# Altium PCB PCB_Propu.PcbDoc
Units mm, origin at the board's own origin, x right, y up, seen from the top; angles counter-clockwise.
Board outline 75 x 44.6 mm, 2 copper layers (Top Layer, Bottom Layer); 37 components, 24 nets, 135 pads, 4 vias.
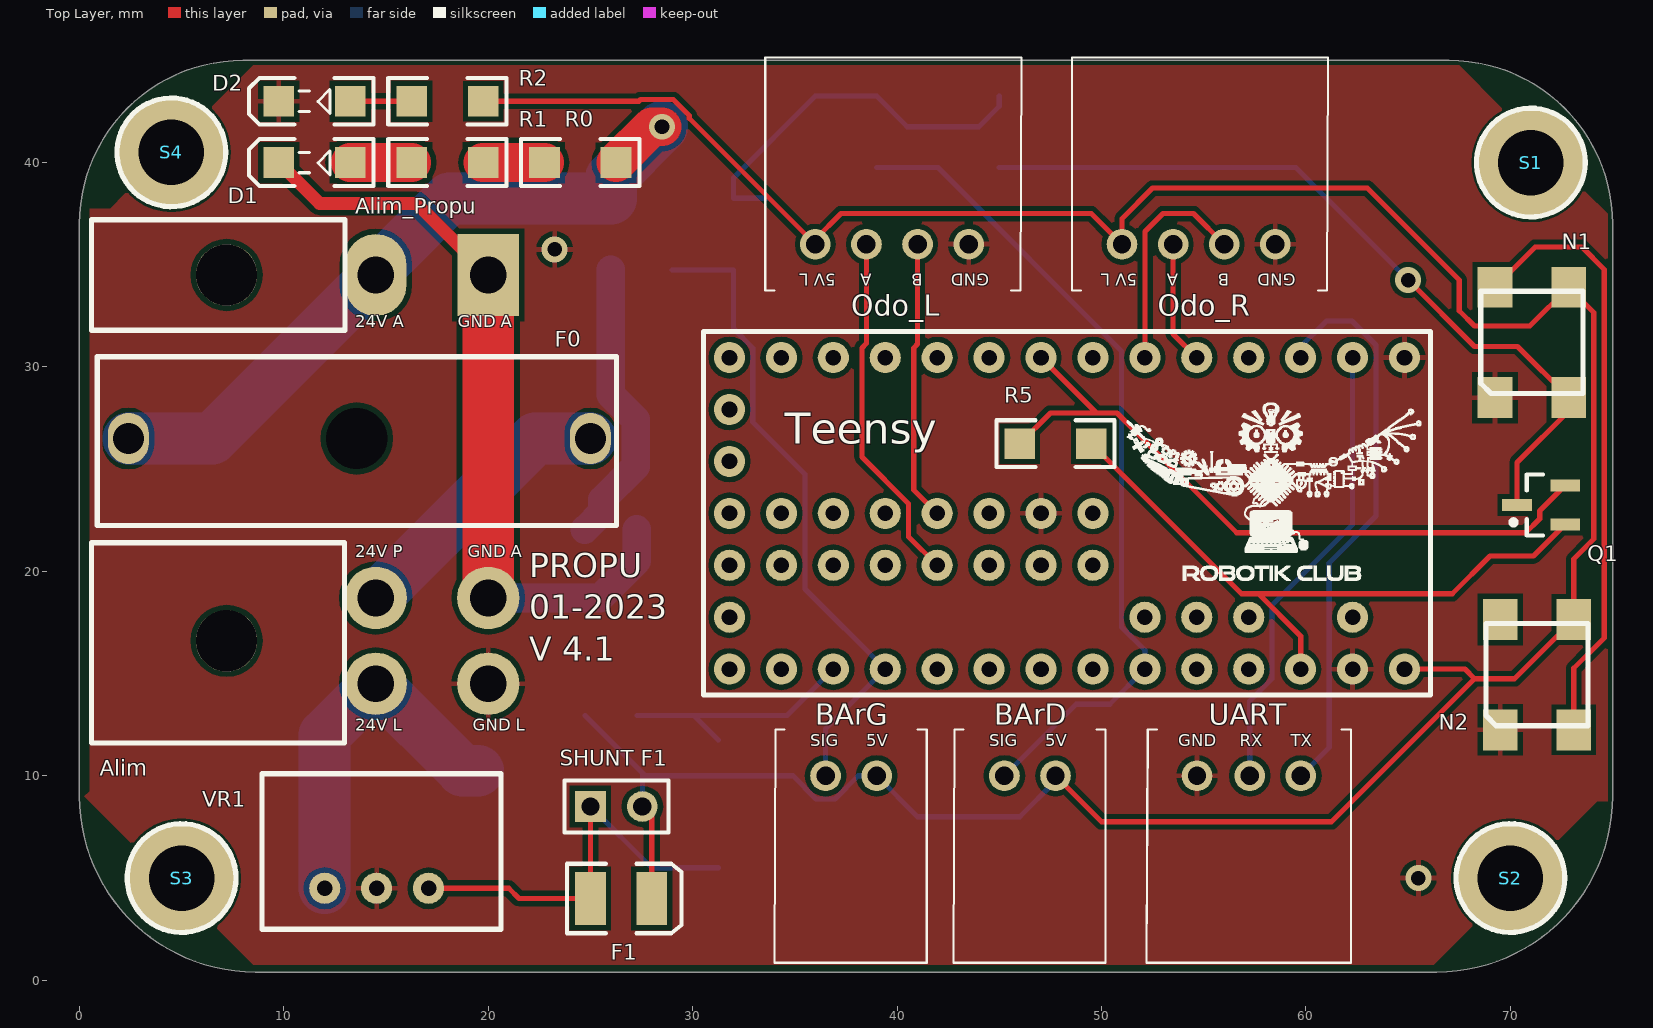
[diagram p0: Top Layer view]
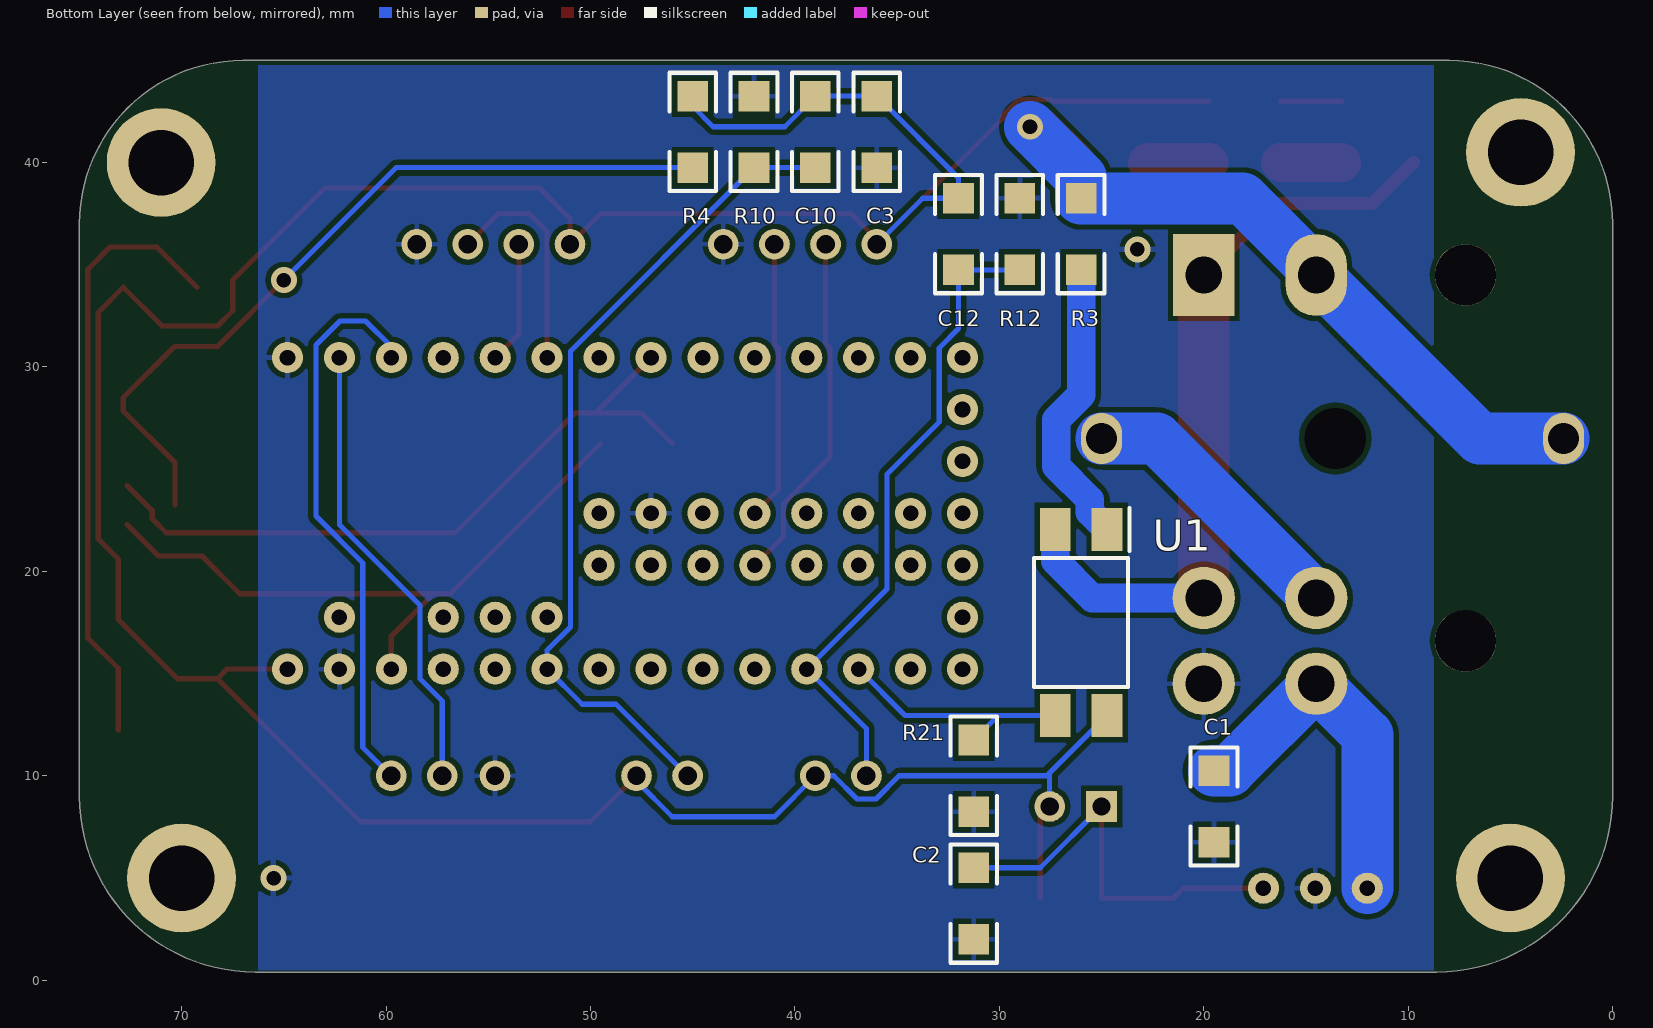
[diagram p1: Bottom Layer view, seen from below]

## Layer stack, top to bottom
Top Solder: solder mask 0.0102, Solder Resist, Dk 3.5
Top Layer: signal copper 0.0356
Dielectric 1: dielectric 0.32, FR-4, Dk 4.8
Bottom Layer: signal copper 0.0356
Bottom Solder: solder mask 0.0102, Solder Resist, Dk 3.5

## Board outline
8.6,0.4 66.4,0.4 ccw(c66.4,9) 75,9 75,37 ccw(c67,37) 67,45 8,45 ccw(c8,37) 0,37 0,9 ccw(c8.6,9)

## Design rules (kind name [scope] priority, off if disabled: settings)
Clearance [All] p1: gap=0.254 ignorepadtopadclearanceinfootprint=FALSE
PolygonConnect [All] p1: connectstyle=Relief reliefconductorwidth=0.254 reliefentries=4 polygonreliefangle="90 Angle" airgapwidth=0.254
RoutingVias [All] p1: holewidth=0.711 width=1.27 viastyle="Through Hole" minholewidth=0.711 minwidth=1.27 maxholewidth=0.711 maxwidth=1.27
SolderMaskExpansion [All] p1: expansion=0.102 istentingtop=FALSE
Width [All] p1: maxlimit=2.54 minlimit=0.254 preferedwidth=2.54
30 further rules are at their usual default settings.

## Components (designator, comment, footprint, x,y, rotation, side; value= is the part's Value field where it differs from the comment)
Alim "MinifitJr 2X2H" MOLEX_MINIFITJR_2X2H 14.5,14.5 r270 top
Alim_Propu "MinifitJR 2H" Molex_MiniFitJr_2x1H 14.5,34.5 r180 top
BArD "JST XH 2" S2B-XH-A 47.75,10 r180 top
BArG "JST XH 2" S2B-XH-A 39,10 r180 top
C1 "" "Capacitor 1206" 19.5,8.5 r90 bottom
C2 "(Optinal)" "Capacitor 1206" 31.25,3.75 r90 bottom
C3 "(Optinal)" "Capacitor 1206" 36,41.5 r90 bottom
C10 "Cap" "Capacitor 1206" 39,41.5 r90 bottom
C12 "Cap" "Capacitor 1206" 32,36.5 r90 bottom
D1 "A" KP-3216SEC 11.5,40 r180 top
D2 "L" KP-3216SEC 11.5,43 r180 top
F0 "10A max" Fuse 25,26.5 r180 top
F1 "500mA" 3.5X2.8X1.9 26.5,4 r0 top
N1 "WS2812C" Neopixel 69.25,28.5 r90 top
N2 "WS2812C" Neopixel 69.5,12.25 r90 top
Odo_L "JST XH 4" S4B-XH-A 36,36 r0 top
Odo_R "JST XH 4" S4B-XH-A 51,36 r0 top
Q1 "MOSFET-N" SOT23_M 71.5,23.25 r180 top
R0 "Res2" "Resistor 1206" 24.5,40 r180 top
R1 "Res2" "Resistor 1206" 18,40 r180 top
R2 "Res2" "Resistor 1206" 18,43 r180 top
R3 "Res2" "Resistor 1206" 26,36.5 r90 bottom
R4 "Res2" "Resistor 1206" 45,41.5 r90 bottom
R5 "Res2" "Resistor 1206" 47.75,26.25 r0 top
R10 "Res2" "Resistor 1206" 42,41.5 r90 bottom
R12 "Res2" "Resistor 1206" 29,36.5 r90 bottom
R21 "Res2" "Resistor 1206" 31.25,10 r90 bottom
S1 "Screw M3" "Screw M3" 71,40 r0 top
S2 "Screw M3" "Screw M3" 70,5 r0 top
S3 "Screw M3" "Screw M3" 5,5 r0 top
S4 "Screw M3" "Screw M3" 4.5,40.5 r0 top
"SHUNT F1" "Header 2" HDR1X2 25,8.5 r0 top
Teensy "Teensy 3.2" teensy 44.5,33 r270 top
U1 "FOD817S" SOP254P1016X385-4N 26,17.5 r270 bottom
UART "JST XH 3" S3B-XH-A 59.75,10 r180 top
VR1 "TSR 1-2405" TRS 12,4.5 r180 top
? "" Logo_lowres 58.25,24.5 r0 top

## Footprints (in the part's own frame and the unit in brackets; to place one, negate y for a bottom-side part, rotate by r counter-clockwise, add the part's x,y. Pads: shape width x height; smd on the part's side, far side on the other; paste and mask are expansions set on the pad)
3.5X2.8X1.9 [mm] "SM LED; 2 C-Bend Leads; Body 3.5 x 2.8 x 1.9 mm, inc leads (LxWxH typ)"
  rect 1.5x2.6 smd: 1(-1.5,0) 2(1.5,0)
  silkscreen extent -2.65,-1.7 2.95,1.7
"Capacitor 1206" [mm]
  rect 1.5x1.5 smd: 1(-1.75,0) 2(1.75,0)
  silkscreen extent -2.89,-1.14 2.89,1.14, body extent -1.98,-0.99 1.98,0.96, height 1.3
Fuse [mm] "Porte-fusible monté sur circuit 10 (UL) A, 6.3 (VDE) A, fusible Cartouche, 893-0574"
  round 2 hole 3: 0(11.43,0)
  oval 2x2.5 hole 1.5: 1(0,0) 2(22.6,0)
  silkscreen extent -1.27,-4 24.13,4.25, body extent -1.27,-4.29 24.13,4.29, height 11.41
HDR1X2 [mm] "Connector; Header; 2 Position"
  rect 1.5x1.5 hole 0.9: 1(0,0)
  round 1.5 hole 0.9: 2(2.54,0)
  silkscreen extent -1.27,-1.27 3.81,1.27
KP-3216SEC [mm]
  rect 1.5x1.5 smd: 1(-1.75,0) 2(1.75,0)
  silkscreen extent -2.89,-1.14 3.2,1.14, body extent -1.7,-0.79 1.5,0.81, height 1.1
Logo_lowres [mm]
  silkscreen extent -7.01,-4.93 7.39,3.76
Molex_MiniFitJr_2x1H [mm] "Connecteur Molex 2"
  rect 3x4 hole 1.8: 1(-5.5,0)
  oval 3x4 hole 1.8: 2(0,0)
  round 3 hole 3 unplated: 3(7.3,0)
  silkscreen extent 1.5,-2.7 13.9,2.7, body extent -6.03,-2.7 13.9,3.1, height 11.01
MOLEX_MINIFITJR_2X2H [mm] "MOLEX_MINIFITJR_3X2, 39-30-1060"
  round 3.048 hole 1.8: 1(-4.2,5.5) 2(-4.2,0) 3(0,5.5) 4(0,0)
  round 3 hole 3 unplated: 10(-2.1,-7.3)
  silkscreen extent -6.9,-13.9 2.9,-1.52, body extent -6.88,-13.9 3.12,6.03, height 11.4
Neopixel [mm]
  rect 2x1.7 smd: 1(5.4,0) 2(0,0) 3(0,-3.6) 4(5.4,-3.6)
  silkscreen extent 0.2,-4.3 5.2,0.7, body extent 0.19,-4.33 5.19,0.67, height 2
"Resistor 1206" [mm]
  rect 1.5x1.5 smd: 1(-1.75,0) 2(1.75,0)
  silkscreen extent -2.89,-1.14 2.89,1.14, body extent -1.98,-0.95 1.98,0.93, height 0.55
S2B-XH-A [mm]
  round 1.5 hole 0.9: 1(0,0) 2(2.5,0)
  silkscreen extent -2.45,-2.26 5,9.14, body extent -2.41,-2.32 4.99,9.18, height 6.15
S3B-XH-A [mm]
  round 1.5 hole 0.9: 1(0,0) 2(2.5,0) 3(5.08,0)
  silkscreen extent -2.45,-2.26 7.54,9.14, body extent -2.44,-2.27 7.46,9.23, height 6.15
S4B-XH-A [mm]
  round 1.5 hole 0.9: 1(0,0) 2(2.5,0) 3(5,0) 4(7.5,0)
  silkscreen extent -2.45,-2.26 10.08,9.14, body extent -2.44,-2.32 9.96,9.18, height 6.15
"Screw M3" [mm] "M3 iso Screw"
  round 5.32 hole 3.2 unplated: 0(0,0)
  silkscreen extent -2.66,-2.66 2.66,2.66
SOP254P1016X385-4N [mm]
  rect 2.1x1.5 smd: 1(-4.55,1.27) 2(-4.55,-1.27) 3(4.55,-1.27) 4(4.55,1.27)
  silkscreen extent -5.6,-2.3 3.15,2.37, body extent -3.53,-1.4 3.48,1.44, height 2.21
SOT23_M [mm] "SOT23, 3-Leads, Body 2.9x1.3mm, Pitch 0.95mm, Lead Span 2.3mm - Reverse Pinning, IPC Low Density"
  rect 1.45x0.6 smd: 1(1.175,0) 2(-1.175,-0.95) 3(-1.175,0.95)
  silkscreen extent -0.1,-1.5 1.47,1.5, body extent -0.7,-1.5 0.7,1.5, height 1.1
teensy [mil] "Teensy 3.2"
  round 60 hole 30: 0(100,700) 1(100,600) 2(100,500) 3(100,400) 4(100,300) 5(100,200) 6(100,100) 7(100,0) 8(100,-100) 9(100,-200) 10(100,-300) 11(100,-400) 12(100,-500) 13(700,-500) 14(700,-400) 15(700,-300) 16(700,-200) 17(700,-100) 18(700,0) 19(700,100) 20(700,200) 21(700,300) 22(700,400) 23(700,500) 24(400,0) 25(400,-100) 26(400,-200) 27(400,-300) 28(400,-400) 29(500,-400) 30(500,-300) 31(500,-200) 32(500,-100) 33(500,0) 34(600,400) 35(600,300) 36(400,200) 37(500,200) 38(600,500) 39(500,100) 40(400,100) 41(700,600) 42(700,700) 43(700,800) 44(100,800) 45(600,-500) 46(500,-500) 47(400,-500) 48(300,-500) 49(200,-500) 50(600,700)
  silkscreen extent 50,-550 750,850, body extent 48,-550 752,907, height 505
TRS [mil]
  round 60 hole 30: 1(0,0) 2(-100,0) 3(-200,0)
  silkscreen extent -340,-220 121,79, body extent -341,-218 120,80, height 398

## Part data
Alim: library part "Header 2X2H", "Header, 2-Pin, Dual row, Right Angle"
Alim_Propu BArD BArG: library part "Header 2", "Header, 2-Pin"
C1 C2 C3: library part Cap, "Capacitor"
C10 C12: "Capacitor"
D1 D2: library part LED2, "Typical RED, GREEN, YELLOW, AMBER GaAs LED"
F0: library part "Fuse 2", "Main Fuse"
F1: library part "Fuse 2", "Fuse"
N1 N2: "Intelligent control LED"
Odo_L Odo_R: library part "Header 4H", "Molex SPOX 4x1H"
Q1: "N-Channel MOSFET"
R0 R1 R2 R3 R4 R5 R10 R12 R21: "Resistor"
"SHUNT F1": "Header, 2-Pin"
Teensy: library part teensy3.2
U1: library part Optoisolator1, "4-Pin Phototransistor Optocoupler"
UART: library part "Header 3H", "Header, 3-Pin, Right Angle"
VR1: library part "Volt Reg", "Voltage Regulator"

## Via types
v1: diameter 1.27, hole 0.711, Top Layer to Bottom Layer, 4 vias

## Nets (pads, with @x,y where several pads share a name; then routed paths per layer and width w, separated by ;. In a path a pad name is that pad's centre, name@x,y a point inside that pad or via, vN(x,y) a via of type N, cw(c..) or ccw(c..) an arc to the next point about the centre after c; other vN are vias at no path point)
3V_L: Q1.3 R5.2 Teensy.41 | length 32.2
  Top Layer w0.254: R5.2 56.847,18.903 57.673,18.903 ; Teensy.41 59.74,16.836 57.673,18.903 ; Q1.3 71.125,20.75 69,20.75 67.153,18.903 57.673,18.903
5V_L: "SHUNT F1.2" BArD.1 BArG.1 C3.2 C10.2 C12.2 F1.2 N1.4 N2.4 Odo_L.1 Odo_R.1 R2.1 R4.2 Teensy.43 U1.4 | length 170.5
  Top Layer w0.254: R2.1 27.364,43 27.448,43.084 29.052,43.084 29.833,42.302 29.833,42.166 Odo_L.1 36,36.25 37.25,37.5 49.5,37.5 Odo_R.1 51,37.25 52.5,38.75 63,38.75 67.5,34.25 67.5,32.75 68.25,32 70.95,32 N1.4 74.081,32.669 74.081,21.581 73.1,20.6 N2.4 70.2,14.75 68.25,14.75 ; 27.54,8.5 28,8.04 F1.2 ; BArD.1 50,7.75 61.25,7.75 68.25,14.75 ; Teensy.43 67.78,15.22 68.25,14.75
  Bottom Layer w0.254: U1.4 27.54,10.14 ; 27.54,8.5 27.54,10.14 ; Odo_L.1 33.75,38.25 C12.2 32,39.25 C3.2 C10.2 40.5,41.75 44,41.75 45,42.75 R4.2 ; BArD.1 47.75,9.75 46,8 41,8 BArG.1 38.099,10 36.968,8.869 36.032,8.869 34.901,10 27.68,10 27.54,10.14
24V_A: Alim_Propu.2 F0.2 R0.1 R3.2 | length 37.1
  Top Layer w0.254: Alim_Propu.2@13.5,34.5 Alim_Propu.2
  Top Layer w1.905: R0.1 28,41.75 v1(28.5,41.75)
  Bottom Layer w2.54: F0.2 6.5,26.5 Alim_Propu.2 14.5,34.655 18.095,38.25 R3.2 26,39.25 v1(28.5,41.75)
24V_L: Alim.4 C1.2 VR1.1 | length 17.8
  Bottom Layer w2.54: VR1.1 12,12 Alim.4 18.75,10.25 C1.2
24V_P: Alim.2 F0.1 | length 13.7
  Bottom Layer w2.54: Alim.2 22.3,26.5 F0.1
GND_A: Alim.1 Alim_Propu.1 D1.2 U1.2 | length 37.9
  Top Layer w0.635: D1.2 11.75,38 16.5,38 Alim_Propu.1
  Top Layer w2.54: Alim.1 Alim_Propu.1
  Bottom Layer w1.397: Alim.1 25.45,18.7 27.27,20.52 U1.2
GND_L: Alim.3 C1.1 C2.1 C3.1 D2.2 N1.2 N2.2 Odo_L.4 Odo_R.4 R10.2 R12.2 R21.1 Teensy.40 Teensy.42 Teensy.44 UART.3 VR1.2
  other v1: 65.5,5 23.25,35.75
NetC2_2: "SHUNT F1.1" C2.2 F1.1 VR1.3 | length 20.1
  Top Layer w0.254: VR1.3 21,4.5 21.5,4 F1.1 25,8.5
  Bottom Layer w0.254: 25,8.5 28,5.5 C2.2
NetD1_1: D1.1 R1.2 | length 3
  Top Layer w1.905: D1.1 R1.2
NetD2_1: D2.1 R2.2 | length 3
  Top Layer w0.254: D2.1 R2.2
NetN1_2: N1.1 N2.3 | length 29.7
  Top Layer w0.254: N1.1 71.212,35.862 73.5,35.862 74.589,34.773 74.589,16.75 73.1,15.261 N2.3
NetN1_4: N1.3 Q1.1 R4.1 | length 38.8
  Top Layer w0.254: v1(65,34.25) 68.25,31 70.35,31 N1.3 72.85,27.85 70.325,25.325 Q1.1
  Bottom Layer w0.254: R4.1 59.5,39.75 v1(65,34.25)
NetR0_2: R0.2 R1.1 | length 3
  Top Layer w1.905: R1.1 R0.2
NetR3_1: R3.1 U1.1 | length 14.2
  Bottom Layer w1.397: U1.1 25.567,22.888 25.567,23.495 27.223,25.15 27.223,27.421 26,28.643 R3.1
T_BUMP_ARD: BArD.2 C10.1 R10.1 Teensy.21 | length 40.8
  Bottom Layer w0.254: C10.1 R10.1 50.977,30.773 50.977,17.287 52.12,16.144 Teensy.21 50.4,13.5 48.75,13.5 BArD.2
T_BUMP_ARG: BArG.2 C12.1 R12.1 Teensy.16 | length 32
  Bottom Layer w0.254: R12.1 C12.1 32,31.876 32.943,30.933 32.943,27.307 35.5,24.75 35.5,19.14 Teensy.16 36.5,12.3 BArG.2
T_NEOPIXEL: Q1.2 R5.1 Teensy.6 | length 34.7
  Top Layer w0.254: R5.1 47.5,27.75 49.75,27.75 ; Teensy.6 49.75,27.75 ; Q1.2 71.431,22.956 71.431,22.569 70.75,21.888 56.612,21.888 50.75,27.75 49.75,27.75
T_ODO_L_A: Odo_L.2 Teensy.32 | length 17.3
  Top Layer w0.254: Odo_L.2 38.5,31.156 38.277,30.933 38.277,25.599 40.563,23.313 40.563,21.697 Teensy.32
T_ODO_L_B: Odo_L.3 Teensy.25 | length 13.7
  Top Layer w0.254: Odo_L.3 41,31.116 40.817,30.933 40.817,23.983 Teensy.25
T_ODO_R_A: Odo_R.2 Teensy.3 | length 6
  Top Layer w0.254: Odo_R.2 53.5,31.62 Teensy.3
T_ODO_R_B: Odo_R.3 Teensy.4 | length 11
  Top Layer w0.254: Teensy.4 52.131,30.46 52.131,36.631 53,37.5 54.5,37.5 Odo_R.3
T_RX1: Teensy.0 UART.2 | length 22.5
  Bottom Layer w0.254: UART.2 57.25,13.654 58.343,14.747 58.343,18.343 62.28,22.28 Teensy.0
T_SENSE_PROPU: R21.2 Teensy.15 U1.3 | length 12.2
  Bottom Layer w0.254: U1.3 30.05,12.95 ; R21.2 30.05,12.95 ; Teensy.15 34.61,12.95 30.05,12.95
T_TX1: Teensy.1 UART.1 | length 27.8
  Bottom Layer w0.254: Teensy.1 59.74,30.99 61,32.25 62.25,32.25 63.423,31.077 63.423,22.705 61.137,20.419 61.137,11.387 UART.1
pads on no net: Alim.10 Alim_Propu.3 F0.0 N2.1 S1.0 S2.0 S3.0 S4.0 Teensy.2 Teensy.5 Teensy.7 Teensy.8 Teensy.9 Teensy.10 Teensy.11 Teensy.12 Teensy.13 Teensy.14 Teensy.17 Teensy.18 Teensy.19 Teensy.20 Teensy.22 Teensy.23 Teensy.24 Teensy.26 Teensy.27 Teensy.28 Teensy.29 Teensy.30 Teensy.31 Teensy.33 Teensy.34 Teensy.35 Teensy.36 Teensy.37 Teensy.38 Teensy.39 Teensy.45 Teensy.46 Teensy.47 Teensy.48 Teensy.49 Teensy.50

## Polygon pours and split planes (outlines as drawn)
GND_L on Bottom Layer "GND_plane" (solid, remove dead copper, pour order 0): 8.75,0.5 66.25,0.5 66.25,44.75 8.75,44.75 8.75,0.75
GND_L on Top Layer "GND_plane" (solid, remove dead copper, pour order 2): 8.5,44.75 1.5,37.75 0.5,37.75 0.5,9.25 0.25,9 8.5,0.75 8.75,0.75 66.25,0.75 74.25,8.75 74.75,8.75 74.75,37.5 67.5,44.75 67.25,44.75 8.5,44.75

## Silkscreen, mask and mechanical layers (free items; w line width, h text height)
Top Overlay:
  text "5V L" at 37,34.75 h1.02 r180
  text "A" at 38.75,34.75 h1.02 r180
  text "B" at 41.25,34.75 h1.02 r180
  text "GND" at 44.5,34.75 h1.02 r180
  text "5V L" at 51.75,34.75 h1.02 r180
  text "A" at 53.75,34.75 h1.02 r180
  text "B" at 56.25,34.75 h1.02 r180
  text "GND" at 59.5,34.75 h1.02 r180
  text "24V A" at 13.5,31.75 h1.02
  text "GND A" at 18.5,31.75 h1.02
  text "24V P" at 13.5,20.5 h1.02
  text "GND A" at 19,20.5 h1.02
  text "PROPU / 01-2023 / V 4.1" at 22,15.25 h2.03
  text "24V L" at 13.5,12 h1.02
  text "GND L" at 19.25,12 h1.02
  text "SIG" at 35.75,11.25 h1.02
  text "5V" at 38.5,11.25 h1.02
  text "SIG" at 44.5,11.25 h1.02
  text "5V" at 47.25,11.25 h1.02
  text "GND" at 53.75,11.25 h1.02
  text "RX" at 56.75,11.25 h1.02
  text "TX" at 59.25,11.25 h1.02
Mechanical 1:
  lines w0.254: 8,0.496 cw(c8,8.5) 0,8.75 0,37.5 cw(c7.75,37.25) 7.5,45 66.244,45 ; 8.004,0.5 66.25,0.5 ccw(c66.75,8.75) 75.015,8.75 ; 66.264,45.02 cw(c66.75,36.75) 75,37.5 75,8.75